# Altium PCB Kasli-DIOT.PCBDOC (part 2 of 23)
Units mm, origin at the board's own origin, x right, y up, seen from the top; angles counter-clockwise.
Board outline 222.9 x 100 mm, 10 copper layers (TopLayer, Layer 2, Layer 3, Layer 4, Layer 5, Layer 6, Layer 7, layer 8, Layer 9, BottomLayer), stack 1.564 mm thick; 977 components, 900 nets, 4676 pads, 2725 vias.
Unrouted connection lines stored in the file: 17.
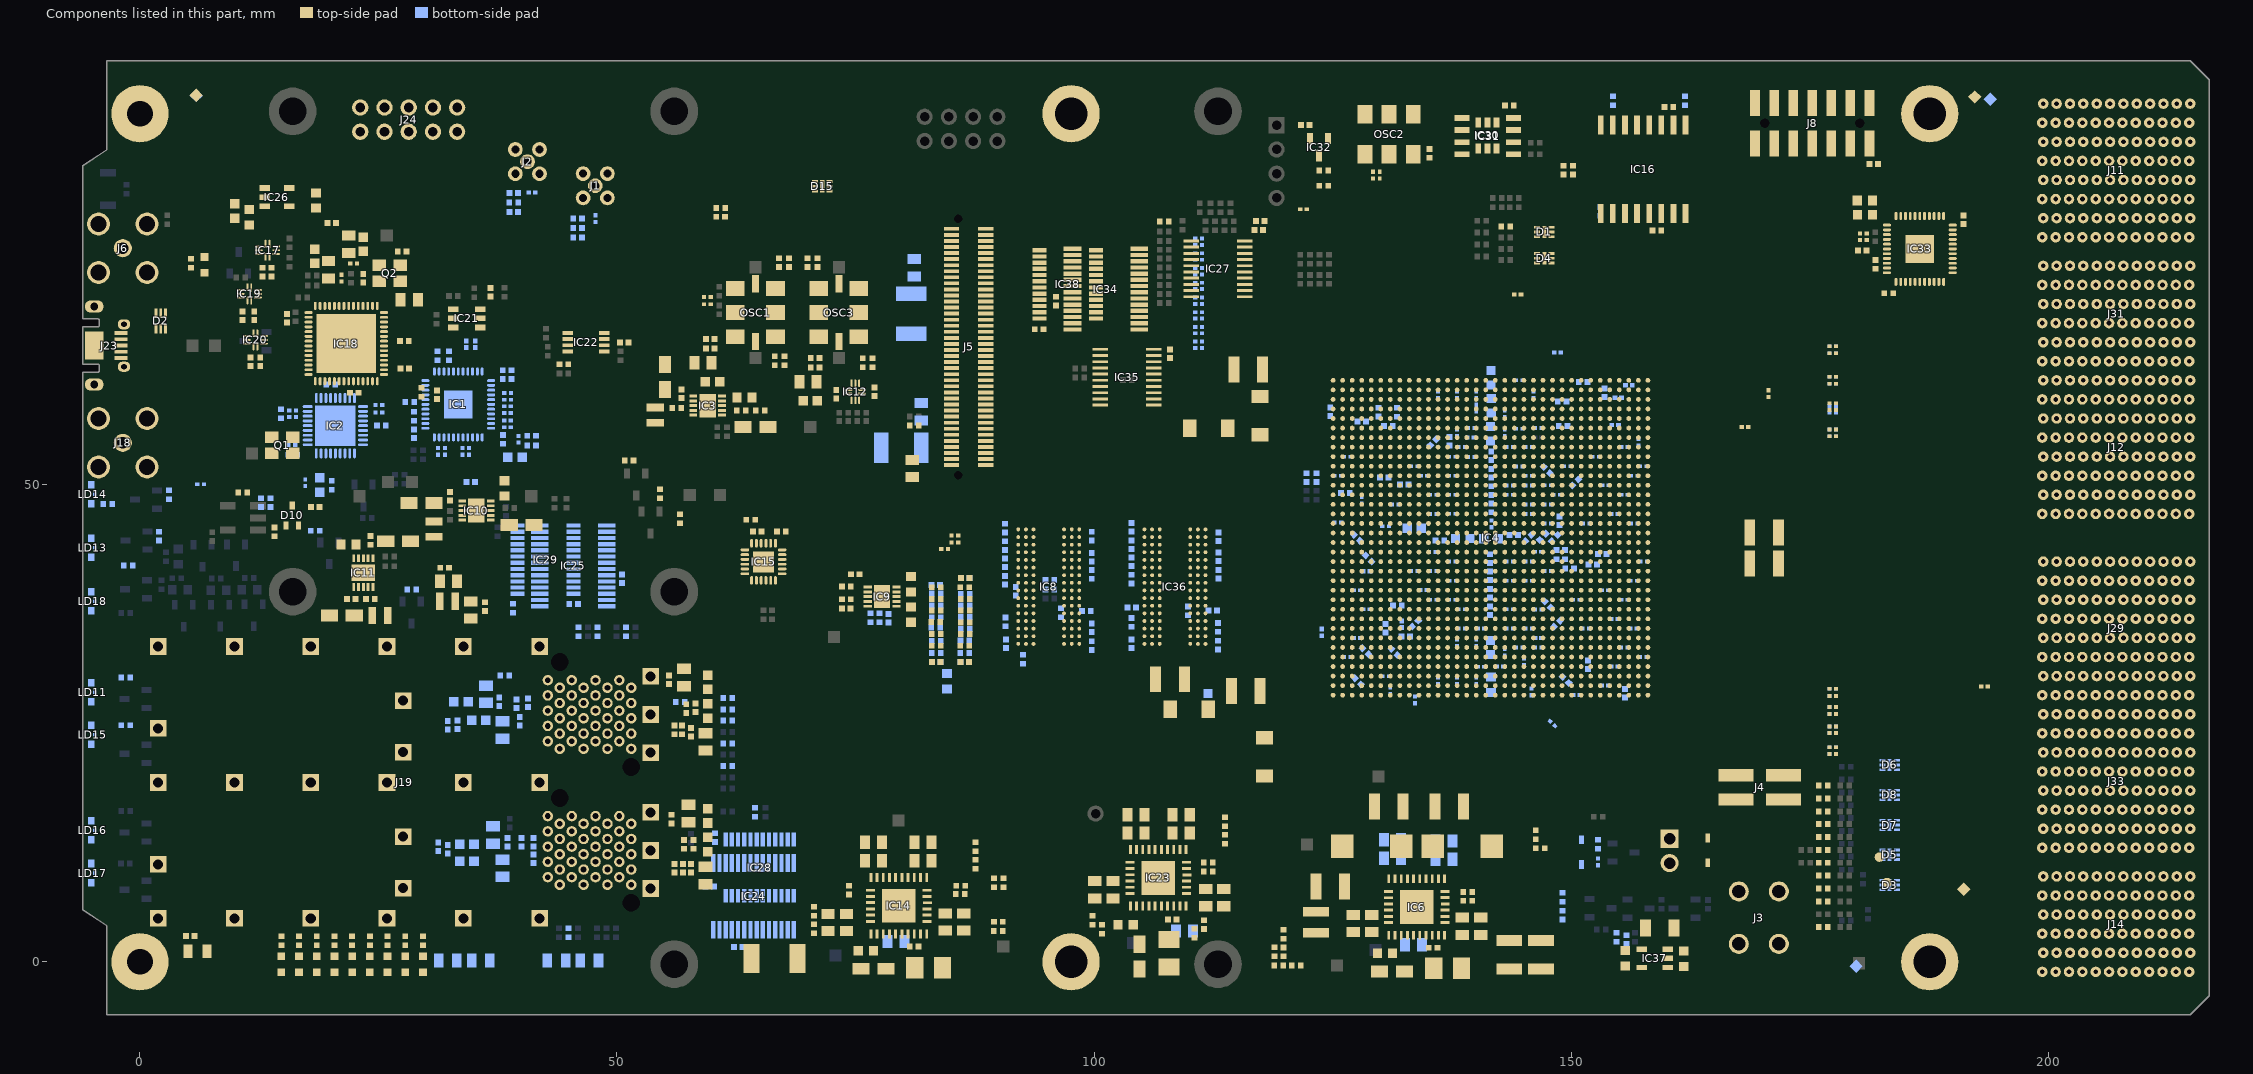
[diagram p10: the components of this part, seen from the top]

## Classes and differential pairs (continued)
differential pair SLOT7.LVDS_10: +SLOT7.LVDS_10_P -SLOT7.LVDS_10_N
differential pair SLOT7.LVDS_9: +SLOT7.LVDS_9_P -SLOT7.LVDS_9_N
differential pair SLOT7.LVDS_8: +SLOT7.LVDS_8_P -SLOT7.LVDS_8_N
differential pair SLOT7.LVDS_7: +SLOT7.LVDS_7_P -SLOT7.LVDS_7_N
differential pair SLOT7.LVDS_6: +SLOT7.LVDS_6_P -SLOT7.LVDS_6_N
differential pair SLOT7.LVDS_5: +SLOT7.LVDS_5_P -SLOT7.LVDS_5_N
differential pair SLOT7.LVDS_4: +SLOT7.LVDS_4_P -SLOT7.LVDS_4_N
differential pair SLOT7.LVDS_3: +SLOT7.LVDS_3_P -SLOT7.LVDS_3_N
differential pair SLOT7.LVDS_2: +SLOT7.LVDS_2_P -SLOT7.LVDS_2_N
differential pair SLOT7.LVDS_1: +SLOT7.LVDS_1_P -SLOT7.LVDS_1_N
differential pair SLOT7.LVDS_0: +SLOT7.LVDS_0_P -SLOT7.LVDS_0_N
differential pair SLOT6.LVDS_15: +SLOT6.LVDS_15_P -SLOT6.LVDS_15_N
differential pair SLOT6.LVDS_14: +SLOT6.LVDS_14_P -SLOT6.LVDS_14_N
differential pair SLOT6.LVDS_13: +SLOT6.LVDS_13_P -SLOT6.LVDS_13_N
differential pair SLOT6.LVDS_12: +SLOT6.LVDS_12_P -SLOT6.LVDS_12_N
differential pair SLOT6.LVDS_11: +SLOT6.LVDS_11_P -SLOT6.LVDS_11_N
differential pair SLOT6.LVDS_10: +SLOT6.LVDS_10_P -SLOT6.LVDS_10_N
differential pair SLOT6.LVDS_9: +SLOT6.LVDS_9_P -SLOT6.LVDS_9_N
differential pair SLOT6.LVDS_8: +SLOT6.LVDS_8_P -SLOT6.LVDS_8_N
differential pair SLOT6.LVDS_7: +SLOT6.LVDS_7_P -SLOT6.LVDS_7_N
differential pair SLOT6.LVDS_6: +SLOT6.LVDS_6_P -SLOT6.LVDS_6_N
differential pair SLOT6.LVDS_5: +SLOT6.LVDS_5_P -SLOT6.LVDS_5_N
differential pair SLOT6.LVDS_4: +SLOT6.LVDS_4_P -SLOT6.LVDS_4_N
differential pair SLOT6.LVDS_3: +SLOT6.LVDS_3_P -SLOT6.LVDS_3_N
differential pair SLOT6.LVDS_2: +SLOT6.LVDS_2_P -SLOT6.LVDS_2_N
differential pair SLOT6.LVDS_1: +SLOT6.LVDS_1_P -SLOT6.LVDS_1_N
differential pair SLOT6.LVDS_0: +SLOT6.LVDS_0_P -SLOT6.LVDS_0_N
differential pair SLOT5.LVDS_15: +SLOT5.LVDS_15_P -SLOT5.LVDS_15_N
differential pair SLOT5.LVDS_14: +SLOT5.LVDS_14_P -SLOT5.LVDS_14_N
differential pair SLOT5.LVDS_13: +SLOT5.LVDS_13_P -SLOT5.LVDS_13_N
differential pair SLOT5.LVDS_12: +SLOT5.LVDS_12_P -SLOT5.LVDS_12_N
differential pair SLOT5.LVDS_11: +SLOT5.LVDS_11_P -SLOT5.LVDS_11_N
differential pair SLOT5.LVDS_10: +SLOT5.LVDS_10_P -SLOT5.LVDS_10_N
differential pair SLOT5.LVDS_9: +SLOT5.LVDS_9_P -SLOT5.LVDS_9_N
differential pair SLOT5.LVDS_8: +SLOT5.LVDS_8_P -SLOT5.LVDS_8_N
differential pair SLOT5.LVDS_7: +SLOT5.LVDS_7_P -SLOT5.LVDS_7_N
differential pair SLOT5.LVDS_6: +SLOT5.LVDS_6_P -SLOT5.LVDS_6_N
differential pair SLOT5.LVDS_5: +SLOT5.LVDS_5_P -SLOT5.LVDS_5_N
differential pair SLOT5.LVDS_4: +SLOT5.LVDS_4_P -SLOT5.LVDS_4_N
differential pair SLOT5.LVDS_3: +SLOT5.LVDS_3_P -SLOT5.LVDS_3_N
differential pair SLOT5.LVDS_2: +SLOT5.LVDS_2_P -SLOT5.LVDS_2_N
differential pair SLOT5.LVDS_1: +SLOT5.LVDS_1_P -SLOT5.LVDS_1_N
differential pair SLOT5.LVDS_0: +SLOT5.LVDS_0_P -SLOT5.LVDS_0_N
differential pair SLOT4.LVDS_15: +SLOT4.LVDS_15_P -SLOT4.LVDS_15_N
differential pair SLOT4.LVDS_14: +SLOT4.LVDS_14_P -SLOT4.LVDS_14_N
differential pair SLOT4.LVDS_13: +SLOT4.LVDS_13_P -SLOT4.LVDS_13_N
differential pair SLOT4.LVDS_12: +SLOT4.LVDS_12_P -SLOT4.LVDS_12_N
differential pair SLOT4.LVDS_11: +SLOT4.LVDS_11_P -SLOT4.LVDS_11_N
differential pair SLOT4.LVDS_10: +SLOT4.LVDS_10_P -SLOT4.LVDS_10_N
differential pair SLOT4.LVDS_9: +SLOT4.LVDS_9_P -SLOT4.LVDS_9_N
differential pair SLOT4.LVDS_8: +SLOT4.LVDS_8_P -SLOT4.LVDS_8_N
differential pair SLOT4.LVDS_7: +SLOT4.LVDS_7_P -SLOT4.LVDS_7_N
differential pair SLOT4.LVDS_6: +SLOT4.LVDS_6_P -SLOT4.LVDS_6_N
differential pair SLOT4.LVDS_5: +SLOT4.LVDS_5_P -SLOT4.LVDS_5_N
differential pair SLOT4.LVDS_4: +SLOT4.LVDS_4_P -SLOT4.LVDS_4_N
differential pair SLOT4.LVDS_3: +SLOT4.LVDS_3_P -SLOT4.LVDS_3_N
differential pair SLOT4.LVDS_2: +SLOT4.LVDS_2_P -SLOT4.LVDS_2_N
differential pair SLOT4.LVDS_1: +SLOT4.LVDS_1_P -SLOT4.LVDS_1_N
differential pair SLOT4.LVDS_0: +SLOT4.LVDS_0_P -SLOT4.LVDS_0_N
differential pair SLOT3.LVDS_15: +SLOT3.LVDS_15_P -SLOT3.LVDS_15_N
differential pair SLOT3.LVDS_14: +SLOT3.LVDS_14_P -SLOT3.LVDS_14_N
differential pair SLOT3.LVDS_13: +SLOT3.LVDS_13_P -SLOT3.LVDS_13_N
differential pair SLOT3.LVDS_12: +SLOT3.LVDS_12_P -SLOT3.LVDS_12_N
differential pair SLOT3.LVDS_11: +SLOT3.LVDS_11_P -SLOT3.LVDS_11_N
differential pair SLOT3.LVDS_10: +SLOT3.LVDS_10_P -SLOT3.LVDS_10_N
differential pair SLOT3.LVDS_9: +SLOT3.LVDS_9_P -SLOT3.LVDS_9_N
differential pair SLOT3.LVDS_8: +SLOT3.LVDS_8_P -SLOT3.LVDS_8_N
differential pair SLOT3.LVDS_7: +SLOT3.LVDS_7_P -SLOT3.LVDS_7_N
differential pair SLOT3.LVDS_6: +SLOT3.LVDS_6_P -SLOT3.LVDS_6_N
differential pair SLOT3.LVDS_5: +SLOT3.LVDS_5_P -SLOT3.LVDS_5_N
differential pair SLOT3.LVDS_4: +SLOT3.LVDS_4_P -SLOT3.LVDS_4_N
differential pair SLOT3.LVDS_3: +SLOT3.LVDS_3_P -SLOT3.LVDS_3_N
differential pair SLOT3.LVDS_2: +SLOT3.LVDS_2_P -SLOT3.LVDS_2_N
differential pair SLOT3.LVDS_1: +SLOT3.LVDS_1_P -SLOT3.LVDS_1_N
differential pair SLOT3.LVDS_0: +SLOT3.LVDS_0_P -SLOT3.LVDS_0_N
differential pair SLOT2.LVDS_15: +SLOT2.LVDS_15_P -SLOT2.LVDS_15_N
differential pair SLOT2.LVDS_14: +SLOT2.LVDS_14_P -SLOT2.LVDS_14_N
differential pair SLOT2.LVDS_13: +SLOT2.LVDS_13_P -SLOT2.LVDS_13_N
differential pair SLOT2.LVDS_12: +SLOT2.LVDS_12_P -SLOT2.LVDS_12_N
differential pair SLOT2.LVDS_11: +SLOT2.LVDS_11_P -SLOT2.LVDS_11_N
differential pair SLOT2.LVDS_10: +SLOT2.LVDS_10_P -SLOT2.LVDS_10_N
differential pair SLOT2.LVDS_9: +SLOT2.LVDS_9_P -SLOT2.LVDS_9_N
differential pair SLOT2.LVDS_8: +SLOT2.LVDS_8_P -SLOT2.LVDS_8_N
differential pair SLOT2.LVDS_7: +SLOT2.LVDS_7_P -SLOT2.LVDS_7_N
differential pair SLOT2.LVDS_6: +SLOT2.LVDS_6_P -SLOT2.LVDS_6_N
differential pair SLOT2.LVDS_5: +SLOT2.LVDS_5_P -SLOT2.LVDS_5_N
differential pair SLOT2.LVDS_4: +SLOT2.LVDS_4_P -SLOT2.LVDS_4_N
differential pair SLOT2.LVDS_3: +SLOT2.LVDS_3_P -SLOT2.LVDS_3_N
differential pair SLOT2.LVDS_2: +SLOT2.LVDS_2_P -SLOT2.LVDS_2_N
differential pair SLOT2.LVDS_1: +SLOT2.LVDS_1_P -SLOT2.LVDS_1_N
differential pair SLOT2.LVDS_0: +SLOT2.LVDS_0_P -SLOT2.LVDS_0_N
differential pair SLOT1.LVDS_15: +SLOT1.LVDS_15_P -SLOT1.LVDS_15_N
differential pair SLOT1.LVDS_14: +SLOT1.LVDS_14_P -SLOT1.LVDS_14_N
differential pair SLOT1.LVDS_13: +SLOT1.LVDS_13_P -SLOT1.LVDS_13_N
differential pair SLOT1.LVDS_12: +SLOT1.LVDS_12_P -SLOT1.LVDS_12_N
differential pair SLOT1.LVDS_11: +SLOT1.LVDS_11_P -SLOT1.LVDS_11_N
differential pair SLOT1.LVDS_10: +SLOT1.LVDS_10_P -SLOT1.LVDS_10_N
differential pair SLOT1.LVDS_9: +SLOT1.LVDS_9_P -SLOT1.LVDS_9_N
differential pair SLOT1.LVDS_8: +SLOT1.LVDS_8_P -SLOT1.LVDS_8_N
differential pair SLOT1.LVDS_7: +SLOT1.LVDS_7_P -SLOT1.LVDS_7_N
differential pair SLOT1.LVDS_6: +SLOT1.LVDS_6_P -SLOT1.LVDS_6_N
differential pair SLOT1.LVDS_5: +SLOT1.LVDS_5_P -SLOT1.LVDS_5_N
differential pair SLOT1.LVDS_4: +SLOT1.LVDS_4_P -SLOT1.LVDS_4_N
differential pair SLOT1.LVDS_3: +SLOT1.LVDS_3_P -SLOT1.LVDS_3_N
differential pair SLOT1.LVDS_2: +SLOT1.LVDS_2_P -SLOT1.LVDS_2_N
differential pair SLOT1.LVDS_1: +SLOT1.LVDS_1_P -SLOT1.LVDS_1_N
differential pair SLOT1.LVDS_0: +SLOT1.LVDS_0_P -SLOT1.LVDS_0_N
differential pair MGT8_Tx: +MGT8_Tx_P -MGT8_Tx_N
differential pair MGT8_RxC: +MGT8_RxC_P -MGT8_RxC_N
differential pair MGT7_Tx: +MGT7_Tx_P -MGT7_Tx_N
differential pair MGT7_RxC: +MGT7_RxC_P -MGT7_RxC_N
differential pair MGT6_Tx: +MGT6_Tx_P -MGT6_Tx_N
differential pair MGT6_RxC: +MGT6_RxC_P -MGT6_RxC_N
differential pair MGT5_Tx: +MGT5_Tx_P -MGT5_Tx_N
differential pair MGT5_RxC: +MGT5_RxC_P -MGT5_RxC_N
differential pair MGT4_Tx: +MGT4_Tx_P -MGT4_Tx_N
differential pair MGT4_RxC: +MGT4_RxC_P -MGT4_RxC_N
differential pair MGT3_Tx: +MGT3_Tx_P -MGT3_Tx_N
differential pair MGT3_RxC: +MGT3_RxC_P -MGT3_RxC_N
differential pair MGT2_Tx: +MGT2_Tx_P -MGT2_Tx_N
differential pair MGT2_RxC: +MGT2_RxC_P -MGT2_RxC_N
differential pair MGT1_Tx: +MGT1_Tx_P -MGT1_Tx_N
differential pair MGT1_RxC: +MGT1_RxC_P -MGT1_RxC_N
differential pair DDR_DQS3: +DDR_DQS3_P -DDR_DQS3_N
differential pair DDR_DQS2: +DDR_DQS2_P -DDR_DQS2_N
differential pair DDR_DQS1: +DDR_DQS1_P -DDR_DQS1_N
differential pair DDR_DQS0: +DDR_DQS0_P -DDR_DQS0_N
differential pair DDR_CK: +DDR_CK_P -DDR_CK_N
differential pair 8_PE_CLK: +8_PE_CLK_P -8_PE_CLK_N
differential pair 7_PE_CLK: +7_PE_CLK_P -7_PE_CLK_N
differential pair 6_PE_CLK: +6_PE_CLK_P -6_PE_CLK_N
differential pair 5_PE_CLK: +5_PE_CLK_P -5_PE_CLK_N
differential pair 4_PE_CLK: +4_PE_CLK_P -4_PE_CLK_N
differential pair 3_PE_CLK: +3_PE_CLK_P -3_PE_CLK_N
differential pair 2_PE_CLK: +2_PE_CLK_P -2_PE_CLK_N
differential pair 1_PE_CLK: +1_PE_CLK_P -1_PE_CLK_N
differential pair Helper_DCXO: +Helper_DCXO_P -Helper_DCXO_N
differential pair CK_FPGAIO: +CK_FPGAIO_P -CK_FPGAIO_N
differential pair Main_DCXO: +Main_DCXO_P -Main_DCXO_N
differential pair Main_DCXO_C: +Main_DCXO_C_P -Main_DCXO_C_N
differential pair CK_GTP_125: +CK_GTP_125_P -CK_GTP_125_N
differential pair CKI_GTP: +CKI_GTP_P -CKI_GTP_N
differential pair CKI_FPGAIO: +CKI_FPGAIO_P -CKI_FPGAIO_N
differential pair CKIN0: +CKIN0_P -CKIN0_N
differential pair CLKREC: +CLKREC_P -CLKREC_N
differential pair USB_D_R: +USB_D_R_P -USB_D_R_N
differential pair CK_GTP: +CK_GTP_P -CK_GTP_N
differential pair CKOUT_D_1: +CKOUT_D_1_P -CKOUT_D_1_N
differential pair CKOUT_1: +CKOUT_1_P -CKOUT_1_N

## Components (designator, comment, footprint, x,y, rotation, side; value= is the part's Value field where it differs from the comment)
B28 "SMD Pad" C100 183.115,8.309 r90 top
B29 "SMD Pad" C100 182.321,10.975 r90 top
C1 "100nF" CAPC0603X33N#1 16.001,57.104 r0 bottom
C2 "100nF" CAPC0603X33N#1 16.001,57.791 r0 bottom
C3 "22uF" CAPC2012X135N 34.661,36.888 r90 top
C4 "100nF" CAPC0603X33N#1 33.798,53.5 r270 bottom
C5 "100nF" CAPC0603X33N#1 38.528,57.526 r0 bottom
C6 "100nF" CAPC0603X33N#1 34.498,53.5 r270 bottom
C7 "100nF" CAPC0603X33N#1 25.036,58.35 r0 bottom
C8 "100nF" CAPC0603X33N#1 31.232,53.5 r270 bottom
C9 "22uF" CAPMP3216X180N 55.011,61.3 r90 top
C10 "100nF" CAPC0603X33N#1 25.036,57.575 r0 bottom
C11 "100nF" CAPC0603X33N#1 31.957,53.5 r270 bottom
C12 "4.7uF" CAPC1005X55N 56.761,59.55 r270 top
C13 "22uF" CAPMP3216X180N 21.161,36.287 r180 top
C14 "100nF" CAPC0603X33N#1 38.528,58.232 r0 bottom
C15 "4.7uF" CAPC1005X55N 22.161,38.037 r0 top
C16 "22uF" CAPC1709X100N 63.361,59.15 r180 top
C17 "22uF" CAPC1709X100N 21.856,43.74 r0 top
C18 "22uF" CAPC2012X135N 32.342,39.89 r180 top
C19 "22uF" CAPMP3216X180N 64.511,56.05 r0 top
C20 "100nF" CAPC0603X33N#1 47.736,77.9 r90 bottom
C21 "100nF" CAPC0603X33N#1 41.086,80.65 r180 bottom
C22 "22uF" CAPC2012X135N 79.248,2.128 r0 bottom
C23 "1nF" CAPC1005X55N 16.011,53.15 r0 bottom
C24 "1uF" CAPC1005X55N 25.309,56.199 r180 bottom
C25 "100nF" CAPC0603X33N#1 15.911,54.167 r0 bottom
C26 "100nF" CAPC0603X33N#1 17.331,50.217 r90 bottom
C27 "22uF" CAPC2012X135N 133.504,1.775 r0 bottom
C28 "100nF" CAPC1005X55N 76.986,59.75 r270 top
C29 "100nF" CAPC1005X55N 72.986,59.5 r90 top
C30 "33uF" CAPMP3528X210N 137.061,-0.676 r0 top
C31 "4.7uF" CAPC1005X55N 124.761,57.65 r270 bottom
C32 "10uF" CAPMP3216X180N 131.236,-1 r180 top
C33 "4.7uF" CAPC1005X55N 155.661,28.15 r270 bottom
C34 "4.7uF" CAPC1005X55N 151.761,31.15 r90 bottom
C35 "4.7uF" CAPC1005X55N 130.423,50.775 r180 bottom
C36 "100nF" CAPC1005X55N 135.536,1.475 r180 top
C37 "4.7uF" CAPC1005X55N 128.061,56.65 r180 bottom
C38 "100nF" CAPC1005X55N 31.92,41.31 r180 top
C39 "4.7uF" CAPC1005X55N 130.861,56.15 r0 bottom
C40 "22uF" CAPC2012X135N 109.49,3.225 r180 bottom
C41 "100nF" CAPC0603X33N#1 110.97,65.879 r0 bottom
C42 "22uF" CAPC2012X135N 131.287,12.797 r0 bottom
C43 "10nF" CAPC1005X55N 45.861,75.924 r0 bottom
C44 "10nF" CAPC1005X55N 45.861,77.925 r0 bottom
C45 "22uF" CAPMP3216X180N 27.065,44.086 r0 top
C46 "10nF" CAPC1005X55N 39.186,78.574 r0 bottom
C47 "10nF" CAPC1005X55N 39.186,80.575 r0 bottom
C48 "22uF" CAPC2012X135N 136.689,12.662 r180 bottom
C49 "100nF" CAPC1005X55N 31.142,59.44 r270 top
C50 "22uF" CAPC1608X90N 111.936,27.375 r270 bottom
C51 "100nF" CAPC0603X33N#1 141.657,45.905 r90 bottom
C52 "100nF" CAPC1005X55N 181.744,83.631 r180 top
C53 "100nF" CAPC1005X55N 60.856,78.095 r180 top
C54 "100nF" CAPC0603X33N#1 110.97,68.967 r180 bottom
C55 "470nF" CAPC0603X33N#1 135.561,48.95 r0 bottom
C56 "100uF" CAPC3225X270N 143.535,0.74 r90 top
C57 "4.7uF" CAPC1005X55N 132.503,50.052 r0 bottom
C58 "4.7uF" CAPC1005X55N 149.161,56.15 r0 bottom
C59 "4.7uF" CAPC1005X55N 152.261,41.625 r180 bottom
C60 "470nF" CAPC0603X33N#1 154.561,30.95 r0 bottom
C61 "470nF" CAPC0603X33N#1 157.561,31.95 r0 bottom
C62 "470nF" CAPC0603X33N#1 130.561,45.65 r0 bottom
C63 "100nF" CAPC0603X33N#1 177.436,22.5 r0 top
C64 "470nF" CAPC0603X33N#1 152.611,52.95 r180 bottom
C65 "100uF" CAPC3225X270N 170.236,41.765 r180 top
C66 "4.7uF" CAPC1005X55N 148.531,35.435 r45 bottom
C67 "4.7uF" CAPC1005X55N 150.461,50.25 r225 bottom
C68 "470nF" CAPC0603X33N#1 131.561,47.95 r180 bottom
C69 "470nF" CAPC0603X33N#1 154.561,46.95 r180 bottom
C70 "100nF" CAPC0603X33N#1 177.436,21.775 r0 top
C71 "100nF" CAPC0603X33N#1 177.436,24.675 r0 top
C72 "100nF" CAPC0603X33N#1 177.436,23.975 r0 top
C73 "100nF" CAPC0603X33N#1 177.436,26.7 r0 top
C74 "100nF" CAPC0603X33N#1 177.436,28.625 r0 top
C75 "470nF" CAPC0603X33N#1 157.561,51.95 r0 bottom
C76 "470nF" CAPC0603X33N#1 150.561,37.95 r180 bottom
C77 "100nF" CAPC0603X33N#1 110.97,66.551 r0 bottom
C78 "4.7uF" CAPC1005X55N 153.261,42.75 r0 bottom
C79 "4.7uF" CAPC1005X55N 129.836,57.625 r90 bottom
C80 "470nF" CAPC0603X33N#1 128.061,48.4 r270 bottom
C81 "470nF" CAPC0603X33N#1 157.061,54.45 r90 bottom
C82 "470nF" CAPC0603X33N#1 126.561,52.95 r180 bottom
C83 "470nF" CAPC0603X33N#1 153.561,38.95 r180 bottom
C84 "100uF" CAPC3225X270N 170.236,44.99 r180 top
C85 "4.7uF" CAPC1005X55N 149.061,58.75 r0 bottom
C86 "4.7uF" CAPC1005X55N 133.661,35.45 r45 bottom
C87 "470nF" CAPC0603X33N#1 155.611,48.95 r0 bottom
C88 "470nF" CAPC0603X33N#1 156.611,45.95 r0 bottom
C89 "470nF" CAPC0603X33N#1 153.611,49.95 r180 bottom
C90 "470nF" CAPC0603X33N#1 155.611,53.95 r180 bottom
C91 "330uF" CAPMP7343X190N 129.111,12.125 r180 top
C92 "4.7uF" CAPC1005X55N 127.561,44.45 r315 bottom
C93 "4.7uF" CAPC1005X55N 135.561,54.45 r225 bottom
C94 "4.7uF" CAPC1005X55N 149.436,29.55 r315 bottom
C95 "470nF" CAPC0603X33N#1 137.561,48.95 r0 bottom
C96 "4.7uF" CAPC1005X55N 127.661,29.4 r135 bottom
C97 "470nF" CAPC0603X33N#1 145.061,31.45 r270 bottom
C98 "470nF" CAPC0603X33N#1 135.561,37.95 r0 bottom
C99 "470nF" CAPC0603X33N#1 145.586,47.95 r180 bottom
C100 "100nF" CAPC0603X33N#1 110.97,69.639 r180 bottom
C101 "22uF" CAPC1709X100N 141.613,29.05 r90 bottom
C102 "470nF" CAPC0603X33N#1 138.561,36.95 r0 bottom
C103 "470nF" CAPC0603X33N#1 137.561,50.95 r0 bottom
C104 "470nF" CAPC0603X33N#1 137.561,46.975 r0 bottom
C105 "470nF" CAPC0603X33N#1 143.561,41.95 r180 bottom
C106 "470nF" CAPC0603X33N#1 143.561,36.95 r180 bottom
C107 "470nF" CAPC0603X33N#1 143.561,39.95 r180 bottom
C108 "470nF" CAPC0603X33N#1 143.561,48.95 r180 bottom
C109 "4.7uF" CAPC1005X55N 131.486,32.475 r315 bottom
C110 "4.7uF" CAPC1005X55N 141.511,38.625 r90 bottom
C111 "4.7uF" CAPC1005X55N 141.511,36.8 r90 bottom
C112 "100nF" CAPC0603X33N#1 140.561,30.925 r180 bottom
C113 "100nF" CAPC0603X33N#1 146.561,32.95 r0 bottom
C114 "100nF" CAPC0603X33N#1 138.061,29.45 r90 bottom
C115 "100nF" CAPC0603X33N#1 140.061,29.45 r270 bottom
C116 "100nF" CAPC0603X33N#1 136.061,29.45 r90 bottom
C117 "470nF" CAPC0603X33N#1 135.561,46.95 r0 bottom
C118 "470nF" CAPC0603X33N#1 135.461,42.95 r0 bottom
C119 "470nF" CAPC0603X33N#1 135.561,40.95 r0 bottom
C120 "100nF" CAPC0603X33N#1 145.561,46.925 r180 bottom
C121 "470nF" CAPC0603X33N#1 145.561,39.95 r180 bottom
C122 "100nF" CAPC0603X33N#1 145.561,41.95 r180 bottom
C123 "4.7uF" CAPC1005X55N 147.561,37.45 r135 bottom
C124 "4.7uF" CAPC1005X55N 147.461,51.55 r135 bottom
C125 "470nF" CAPC0603X33N#1 134.586,50.95 r0 bottom
C126 "470nF" CAPC0603X33N#1 156.573,39.95 r180 bottom
C127 "470nF" CAPC0603X33N#1 151.611,45.95 r180 bottom
C128 "470nF" CAPC0603X33N#1 155.611,37.95 r0 bottom
C129 "100uF" CAPC3225X270N 116.161,62.075 r0 top
C130 "22uF" CAPC2012X135N 131.287,10.872 r0 bottom
C131 "22uF" CAPC2012X135N 136.689,10.737 r180 bottom
C132 "22uF" CAPC2012X135N 138.586,3.723 r270 top
C133 "22uF" CAPC2012X135N 140.536,3.723 r270 top
C134 "4.7uF" CAPC1005X55N 141.511,40.45 r90 bottom
C135 "4.7uF" CAPC1005X55N 141.636,49.4 r270 bottom
C136 "470nF" CAPC0603X33N#1 157.611,41.95 r0 bottom
C137 "22uF" CAPC2012X135N 127.161,4 r270 top
C138 "470nF" CAPC0603X33N#1 133.561,51.95 r180 bottom
C139 "470nF" CAPC0603X33N#1 156.546,34.95 r0 bottom
C140 "470nF" CAPC0603X33N#1 151.549,34.95 r180 bottom
C141 "100nF" CAPC0603X33N#1 110.97,64.336 r0 bottom
C142 "100nF" CAPC0603X33N#1 177.436,55.083 r0 top
C143 "4.7uF" CAPC1005X55N 143.986,44.75 r180 bottom
C144 "22uF" CAPC2012X135N 129.111,4 r270 top
C145 "4.7uF" CAPC1005X55N 145.536,44.425 r45 bottom
C146 "470nF" CAPC0603X33N#1 155.561,32.95 r180 bottom
C147 "470nF" CAPC0603X33N#1 153.561,28.95 r180 bottom
C148 "470nF" CAPC0603X33N#1 148.511,48.95 r0 bottom
C149 "470nF" CAPC0603X33N#1 156.611,50.95 r180 bottom
C150 "100uF" CAPC3225X270N 107.961,29.625 r0 top
C151 "4.7uF" CAPC1005X55N 148.286,44.425 r45 bottom
C152 "4.7uF" CAPC1005X55N 147.036,44.55 r45 bottom
C153 "470nF" CAPC0603X33N#1 133.561,40.95 r180 bottom
C154 "470nF" CAPC0603X33N#1 128.561,36.95 r180 bottom
C155 "470nF" CAPC0603X33N#1 127.561,33.95 r0 bottom
C156 "470nF" CAPC0603X33N#1 127.561,38.95 r180 bottom
C157 "100nF" CAPC0603X33N#1 110.97,70.511 r180 bottom
C158 "4.7uF" CAPC1005X55N 148.936,42.2 r180 bottom
C159 "100nF" CAPC0603X33N#1 152.836,10.475 r270 bottom
C160 "100nF" CAPC1005X55N 58.011,12.3 r90 top
C161 "100nF" CAPC1005X55N 160.267,89.586 r0 top
C162 "100nF" CAPC1005X55N 74.986,40.625 r0 top
C163 "100nF" CAPC1005X55N 128.786,42.275 r315 bottom
C164 "10nF" CAPC1005X55N 90.686,40 r270 bottom
C165 "10nF" CAPC1005X55N 112.461,36.825 r180 bottom
C166 "10nF" CAPC1005X55N 103.915,40.125 r270 bottom
C167 "10nF" CAPC1005X55N 132.672,34.109 r180 bottom
C168 "100nF" CAPC1005X55N 128.461,32.55 r135 bottom
C169 "100nF" CAPC1005X55N 99.211,36.775 r180 bottom
C170 "4.7uF" CAPC1005X55N 113.036,44.55 r270 bottom
C171 "470nF" CAPC1005X55N 99.761,44.625 r270 bottom
C172 "1uF" CAPC1005X55N 74.03,37.025 r0 top
C173 "22uF" CAPC1709X100N 84.58,29.4 r90 bottom
C174 "22uF" CAPC1709X100N 80.797,39.571 r270 top
C175 "10nF" CAPC1005X55N 78.48,36.025 r90 bottom
C176 "22uF" CAPC1709X100N 80.797,36.392 r90 top
C177 "100nF" CAPC1005X55N 74.055,39.325 r0 top
C178 "1uF" CAPC1005X55N 32.261,24.8 r90 bottom
C179 "10uF" CAPC2012X95N 36.261,28.05 r270 bottom
C180 "1uF" CAPC1005X55N 37.661,27.25 r270 bottom
C181 "100nF" CAPC1005X55N 40.686,27.15 r270 bottom
C182 "100nF" CAPC1005X55N 39.461,27.05 r270 bottom
C183 "100nF" CAPC1005X55N 39.811,25.2 r90 bottom
C184 "10uF" CAPC2012X95N 38.011,24.3 r90 bottom
C185 "100nF" CAPC1005X55N 33.286,24.85 r90 bottom
C186 "100nF" CAPC1005X55N 107.962,63.753 r90 top
C187 "1uF" CAPC1608X87N 130.501,0.89 r0 top
C188 "100nF" CAPC0603X33N#1 59.464,69.679 r180 top
C189 "100nF" CAPC0603X33N#1 59.464,68.929 r180 top
C190 "1uF" CAPC1005X55N 38.036,54.75 r90 bottom
C191 "100nF" CAPC1005X55N 28.736,55.35 r90 bottom
C192 "100nF" CAPC1005X55N 94.242,66.302 r0 top
C193 "100nF" CAPC1005X55N 117.277,76.689 r180 top
C194 "22uF" CAPC2012X135N 76.886,10.6 r0 top
C195 "22uF" CAPC2012X135N 82.086,12.525 r180 top
C196 "100nF" CAPC1005X55N 122.151,87.712 r0 top
C197 "100nF" CAPC1005X55N 62.702,1.569 r0 bottom
C198 "100nF" CAPC1005X55N 64.689,45.092 r0 top
C199 "100nF" CAPC1005X55N 36.161,37.238 r90 top
C200 "100nF" CAPC0603X33N#1 148.061,24.975 r315 bottom
C201 "100nF" CAPC0603X33N#1 148.586,63.875 r0 bottom
C202 "10uF" CAPC1608X87N 11.461,78.05 r90 top
C203 "100nF" CAPC0603X33N#2 144.411,69.948 r180 top
C204 "100nF" CAPC1005X55N 159.011,76.675 r0 top
C205 "22uF" CAPC1709X100N 18.436,79.8 r270 top
C206 "4.7uF" CAPC2012X135N 28.23,69.38 r180 top
C207 "22pF" CAPC1005X55N 27.468,74.46 r180 top
C208 "22pF" CAPC1005X55N 23.404,71.666 r270 top
C209 "4.7uF" CAPC2012X135N 21.88,75.222 r270 top
C210 "100nF" CAPC0603X33N#1 22.388,73.19 r0 top
C211 "4.7uF" CAPC2012X135N 19.761,72.55 r270 top
C212 "100nF" CAPC0603X33N#1 21.118,71.666 r270 top
C213 "100nF" CAPC1005X55N 20.086,77.45 r180 top
C214 "100nF" CAPC1005X55N 12.609,62.903 r90 top
C215 "100nF" CAPC1005X55N 11.974,67.729 r90 top
C216 "100nF" CAPC1005X55N 36.74,70.2 r270 top
C217 "100nF" CAPC1005X55N 12.863,72.301 r90 top
C218 "100nF" CAPC1005X55N 11.593,62.903 r90 top
C219 "100nF" CAPC1005X55N 10.736,67.725 r90 top
C220 "100nF" CAPC1005X55N 44.443,62.633 r0 top
C221 "100nF" CAPC1005X55N 50.761,64.925 r180 top
C222 "100nF" CAPC1005X55N 27.722,65.062 r180 top
C223 "100nF" CAPC1005X55N 15.403,67.475 r270 top
C224 "100nF" CAPC1005X55N 27.736,62.175 r180 top
C225 "22uF" CAPMP3216X180N 29.502,48.08 r180 top
C226 "1nF" CAPC1005X55N 59.761,65.3 r0 top
C227 "100nF" CAPC1005X55N 50.52,40.15 r90 bottom
C228 "100nF" CAPC0603X33N#1 6.35,50.05 r0 bottom
C229 "100nF" CAPC0603X33N#1 177.436,57.84 r0 top
C230 "100nF" CAPC0603X33N#1 177.436,25.975 r0 top
C231 "100nF" CAPC0603X33N#1 177.436,27.875 r0 top
C232 "100nF" CAPC0603X33N#1 177.436,55.8 r0 top
C233 "100nF" CAPC0603X33N#1 177.436,58.55 r0 top
C234 "100nF" CAPC1005X55N 38.961,61.562 r270 bottom
C235 "47uF" CAPC3225X270N 124.767,7.893 r180 top
C236 "100nF" CAPC0603X33N#1 129.251,82.45 r270 top
C237 "100nF" CAPC0603X33N#1 129.959,82.45 r270 top
C238 "10nF" CAPC1005X55N 135.166,84.733 r270 top
C239 "100nF" CAPC1005X55N 41.046,55.142 r180 bottom
C240 "4.7uF" CAPC1005X55N 149.847,41.221 r180 bottom
C241 "100nF" CAPC1005X55N 41.046,54.142 r180 bottom
C242 "470nF" CAPC0603X33N#1 39.686,54.775 r90 bottom
C243 "22pF" CAPC1005X55N 38.021,61.562 r270 bottom
C244 "1uF" CAPC1005X55N 57.011,12.3 r90 top
C245 "100nF" CAPC0603X33N#1 121.961,78.875 r180 top
C246 "100nF" CAPC0603X33N#2 35.136,64.732 r270 bottom
C247 "100nF" CAPC0603X33N#2 34.214,64.732 r270 bottom
C258 "100nF" CAPC0603X33N#1 177.436,26.7 r180 bottom
C259 "1uF" CAPC1005X55N 57.261,26.55 r90 top
C260 "10uF" CAPC2012X95N 59.261,23.05 r90 top
C261 "1uF" CAPC1005X55N 57.761,24.05 r90 top
C262 "100nF" CAPC1005X55N 56.011,24.3 r90 top
C263 "100nF" CAPC1005X55N 56.811,24.3 r90 top
C264 "10uF" CAPC2012X95N 57.011,29.8 r270 top
C265 "100nF" CAPC1005X55N 55.461,29.55 r270 top
C266 "100nF" CAPC1005X55N 32.261,11.8 r270 bottom
C267 "1uF" CAPC1005X55N 31.261,12.05 r270 bottom
C268 "10uF" CAPC2012X95N 37.011,13.3 r270 bottom
C269 "1uF" CAPC1005X55N 38.511,12.55 r270 bottom
C270 "100nF" CAPC1005X55N 40.011,12.55 r270 bottom
C271 "100nF" CAPC1005X55N 41.261,12.55 r270 bottom
C272 "10uF" CAPC2012X95N 38.011,9.8 r90 bottom
C273 "100nF" CAPC1005X55N 41.261,10.8 r90 bottom
C274 "10uF" CAPC2012X95N 59.261,9.05 r90 top
C275 "1uF" CAPC1005X55N 57.761,9.8 r90 top
C276 "100nF" CAPC1005X55N 58.235,26.643 r90 top
C277 "100nF" CAPC1005X55N 56.011,9.8 r90 top
C278 "4.7uF" CAPC1005X55N 32.511,48.8 r270 top
C279 "22uF" CAPC1709X100N 38.211,49.625 r270 top
C280 "10uF" CAPC2012X95N 57.511,15.55 r270 top
C281 "100nF" CAPC1005X55N 56.906,9.807 r90 top
C286 "22uF" CAPMP3216X180N 40.011,45.8 r0 top
C287 "1nF" CAPC1005X55N 59.761,64.3 r0 top
C288 "4.7uF" CAPC2012X135N 59.011,62.8 r0 top
C289 "4.7uF" CAPC2012X135N 70.011,60.8 r0 top
C290 "1nF" CAPC1005X55N 70.761,62.3 r0 top
C291 "1nF" CAPC1005X55N 70.761,63.3 r0 top
C292 "4.7uF" CAPC1005X55N 117.425,77.638 r180 top
C293 "100nF" CAPC1005X55N 13.786,72.301 r90 top
C295 "100nF" CAPC0603X33N#1 193.336,28.85 r0 top
C296 "100nF" CAPC1005X55N 18.361,47.684 r180 top
C297 "100nF" CAPC0603X33N#1 168.236,56.05 r180 top
C298 "100nF" CAPC1005X55N 34.661,50.3 r180 bottom
C299 "22uF" CAPC2012X135N 76.886,12.525 r0 top
C300 "100nF" CAPC0603X33N#1 170.703,59.552 r270 top
C301 "22uF" CAPC2012X135N 82.086,10.6 r180 top
C302 "22uF" CAPC2012X135N 101.986,7.55 r270 top
C303 "22uF" CAPC2012X135N 104.411,13.5 r0 top
C304 "22uF" CAPC2012X135N 104.411,15.425 r0 top
C305 "100nF" CAPC1005X55N 45.448,37.517 r0 bottom
C306 "100nF" CAPC1005X55N 59.736,7.875 r0 bottom
C307 "100nF" CAPC1005X55N 143.547,89.774 r0 top
C308 "470nF" CAPC0603X33N#1 154.561,35.937 r180 bottom
C309 "470nF" CAPC0603X33N#1 125.561,46.05 r180 bottom
C310 "470nF" CAPC0603X33N#1 125.536,50.95 r0 bottom
C311 "470nF" CAPC0603X33N#1 149.611,51.95 r180 bottom
C312 "100uF" CAPC3225X270N 115.911,28.4 r0 top
C313 "4.7uF" CAPC1005X55N 148.936,43.175 r180 bottom
C314 "4.7uF" CAPC1005X55N 148.786,46.225 r90 bottom
C315 "470nF" CAPC0603X33N#1 131.061,28.4 r270 bottom
C316 "470nF" CAPC0603X33N#1 130.561,29.925 r180 bottom
C317 "470nF" CAPC0603X33N#1 133.661,27.45 r90 bottom
C318 "470nF" CAPC0603X33N#1 126.561,31.95 r180 bottom
C319 "22uF" CAPC1608X90N 141.636,58.275 r270 bottom
C320 "22uF" CAPC1608X90N 141.563,32.95 r90 bottom
C321 "22uF" CAPC1608X90N 141.611,61.225 r270 bottom
C322 "470nF" CAPC0603X33N#1 140.063,33.45 r270 bottom
C323 "100nF" CAPC0603X33N#1 144.561,32.95 r180 bottom
C324 "100nF" CAPC0603X33N#1 143.061,32.45 r270 bottom
C325 "100nF" CAPC0603X33N#1 145.561,34.95 r180 bottom
C326 "100nF" CAPC0603X33N#1 143.561,34.95 r180 bottom
C327 "100nF" CAPC0603X33N#1 140.561,34.95 r0 bottom
C328 "22nF" CAPC0603X33N#1 145.861,28.3 r90 bottom
C329 "22nF" CAPC0603X33N#1 142.561,30.95 r0 bottom
C330 "22nF" CAPC0603X33N#1 138.561,34.95 r0 bottom
C331 "22nF" CAPC0603X33N#1 138.061,33.45 r270 bottom
C332 "22uF" CAPC1608X90N 141.561,55.35 r90 bottom
C333 "470nF" CAPC0603X33N#1 138.061,59.45 r90 bottom
C334 "100nF" CAPC0603X33N#1 136.061,59.45 r270 bottom
C335 "100nF" CAPC0603X33N#1 143.061,57.45 r90 bottom
C336 "100nF" CAPC0603X33N#1 140.061,59.45 r90 bottom
C337 "100nF" CAPC0603X33N#1 140.061,58.05 r90 bottom
C338 "100nF" CAPC0603X33N#1 146.561,55.95 r180 bottom
C339 "22uF" CAPC1608X90N 138.661,44.35 r180 bottom
C340 "470nF" CAPC0603X33N#1 138.561,53.95 r180 bottom
C341 "100nF" CAPC0603X33N#1 143.561,53.95 r0 bottom
C342 "100nF" CAPC0603X33N#1 145.561,53.95 r180 bottom
C343 "100nF" CAPC0603X33N#1 144.558,55.881 r0 bottom
C344 "100nF" CAPC0603X33N#1 138.061,55.45 r90 bottom
C345 "100nF" CAPC0603X33N#1 139.461,54.95 r0 bottom
C346 "330uF" CAPMP7343X190N 138.586,12.125 r0 top
C347 "22nF" CAPC0603X33N#1 146.061,59.45 r90 bottom
C348 "22nF" CAPC0603X33N#1 144.561,60.95 r180 bottom
C349 "22nF" CAPC0603X33N#1 143.061,55.45 r90 bottom
C350 "22nF" CAPC0603X33N#1 139.561,55.95 r180 bottom
C351 "100uF" CAPC3225X270N 146.86,0.74 r90 top
C352 "4.7uF" CAPC1005X55N 141.511,42.275 r90 bottom
C353 "470nF" CAPC0603X33N#1 145.57,49.937 r180 bottom
C354 "100nF" CAPC0603X33N#1 145.586,50.95 r180 bottom
C355 "4.7uF" CAPC1005X55N 141.636,51.2 r270 bottom
C356 "4.7uF" CAPC1005X55N 141.636,47.575 r270 bottom
C357 "4.7uF" CAPC1005X55N 136.261,44.15 r0 bottom
C358 "4.7uF" CAPC1005X55N 137.261,54.575 r270 bottom
C359 "100uF" CAPC3225X270N 137.232,16.269 r180 top
C360 "100uF" CAPC3225X270N 130.911,16.275 r0 top
C361 "4.7uF" CAPC1005X55N 141.636,53.05 r270 bottom
C362 "33uF" CAPMP3528X210N 82.661,-0.6 r0 top
C363 "33uF" CAPMP3528X210N 107.859,0.901 r270 top
C364 "10uF" CAPMP3216X180N 76.886,-0.725 r180 top
C365 "10uF" CAPMP3216X180N 104.786,0.533 r270 top
C366 "100nF" CAPC1005X55N 81.136,1.625 r180 top
C367 "100nF" CAPC1005X55N 108.191,4.449 r180 top
C368 "470nF" CAPC0603X33N#1 147.561,40.95 r0 bottom
C369 "470nF" CAPC0603X33N#1 146.536,42.975 r0 bottom
C370 "470nF" CAPC0603X33N#1 147.561,45.95 r180 bottom
C371 "470nF" CAPC0603X33N#1 147.561,47.95 r180 bottom
C372 "470nF" CAPC0603X33N#1 147.561,49.95 r180 bottom
C373 "470nF" CAPC0603X33N#1 137.561,52.938 r0 bottom
C374 "470nF" CAPC0603X33N#1 139.561,52.925 r0 bottom
C375 "470nF" CAPC0603X33N#1 144.561,51.925 r180 bottom
C376 "470nF" CAPC0603X33N#1 143.561,49.925 r180 bottom
C377 "470nF" CAPC0603X33N#1 137.561,41.975 r0 bottom
C378 "470nF" CAPC0603X33N#1 137.586,39.95 r0 bottom
C379 "470nF" CAPC0603X33N#1 137.561,37.95 r0 bottom
C380 "470nF" CAPC0603X33N#1 146.561,36.925 r180 bottom
C381 "22uF" CAPC2012X135N 100.061,7.55 r270 top
C382 "1uF" CAPC1608X87N 76.086,1.15 r0 top
C383 "22uF" CAPC2012X135N 84.411,4.175 r270 top
C384 "22uF" CAPC2012X135N 86.336,4.175 r270 top
C385 "22uF" CAPC2012X135N 109.136,13.5 r180 top
C386 "22uF" CAPC2012X135N 109.136,15.425 r180 top
C387 "22uF" CAPC2012X135N 111.711,6.725 r270 top
C388 "22uF" CAPC2012X135N 113.611,6.725 r270 top
C389 "22uF" CAPC2012X135N 74.063,4.135 r270 top
C390 "22uF" CAPC2012X135N 72.113,4.135 r270 top
C391 "1uF" CAPC1608X87N 103.311,3.9 r0 top
C392 "100nF" CAPC0603X33N#1 110.97,65.007 r0 bottom
C393 "100nF" CAPC0603X33N#1 110.97,71.183 r180 bottom
C394 "100nF" CAPC0603X33N#1 85.411,43.953 r180 top
C395 "100nF" CAPC0603X33N#1 85.411,44.671 r180 top
C396 "27pF" CAPC1005X55N 5.275,2.69 r0 top
C397 "100nF" CAPC1005X55N 155.821,2.338 r270 bottom
C398 "10uF" CAPC3216X180N 159.3,3.531 r180 top
C399 "100nF" CAPC0603X33N#1 180.636,76.35 r0 top
C400 "100nF" CAPC0603X33N#1 180.636,75.65 r0 top
C401 "100nF" CAPC0603X33N#1 38.528,56.032 r0 bottom
C402 "100nF" CAPC0603X33N#1 38.528,56.732 r0 bottom
C403 "100nF" CAPC0603X33N#1 110.97,73.599 r0 bottom
C404 "100nF" CAPC1005X55N 180.536,74.575 r0 top
C405 "100nF" CAPC0603X33N#1 110.97,72.055 r180 bottom
C406 "1uF" CAPC1608X87N 180.811,78.3 r0 top
C407 "100nF" CAPC1005X55N 191.161,77.8 r270 top
C408 "100nF" CAPC1005X55N 181.936,73.1 r90 top
C409 "100nF" CAPC1005X55N 22.461,59.65 r180 top
C410 "100nF" CAPC0603X33N#1 177.436,24.675 r180 bottom
C411 "100nF" CAPC0603X33N#1 177.436,23.975 r180 bottom
C412 "100nF" CAPC1005X55N 55.716,14.965 r270 top
C413 "100nF" CAPC0603X33N#1 110.97,74.271 r0 bottom
C414 "100nF" CAPC0603X33N#1 110.97,72.727 r180 bottom
C415 "100nF" CAPC0603X33N#1 110.97,67.423 r0 bottom
C416 "100nF" CAPC0603X33N#1 110.97,75.143 r180 bottom
C417 "100nF" CAPC0603X33N#1 110.97,68.095 r0 bottom
C418 "100nF" CAPC0603X33N#1 110.97,75.815 r180 bottom
C419 "1uF" CAPC1608X87N 161.794,0.327 r270 top
C420 "1uF" CAPC1608X87N 155.671,0.365 r270 top
C421 "100nF" CAPC0603X33N#1 38.533,58.924 r0 bottom
C422 "100nF" CAPC0603X33N#1 84.336,43.275 r180 top
C423 "22uF" CAPC2012X135N 81.161,72.75 r270 bottom
C424 "22uF" CAPC2012X135N 80.936,51.725 r90 top
C425 "22uF" CAPC2012X135N 81.886,57.65 r270 bottom
C427 "100nF" CAPC1005X55N 96.035,69.263 r90 top
C428 "4.7uF" CAPC1005X55N 153.496,59.642 r90 bottom
C429 "4.7uF" CAPC1005X55N 151.261,60.783 r0 bottom
C430 "470nF" CAPC0603X33N#2 156.061,60.45 r180 bottom
C431 "470nF" CAPC0603X33N#2 154.617,56.26 r180 bottom
C432 "470nF" CAPC0603X33N#2 150.561,27.975 r180 bottom
C433 "470nF" CAPC0603X33N#2 154.95,59.138 r0 bottom
C434 "100nF" CAPC0603X33N#1 177.436,28.625 r180 bottom
C435 "100nF" CAPC0603X33N#1 177.436,55.083 r180 bottom
C436 "100nF" CAPC0603X33N#1 177.436,57.565 r180 bottom
C437 "100nF" CAPC0603X33N#1 177.436,25.975 r180 bottom
C438 "100nF" CAPC0603X33N#1 177.436,27.875 r180 bottom
C439 "100nF" CAPC0603X33N#1 177.436,55.8 r180 bottom
C440 "100nF" CAPC0603X33N#1 177.436,58.275 r180 bottom
C441 "100nF" CAPC0603X33N#1 177.436,60.6 r0 top
C442 "100nF" CAPC0603X33N#1 177.436,63.782 r0 top
C443 "100nF" CAPC0603X33N#1 177.436,61.325 r0 top
C444 "100nF" CAPC0603X33N#1 177.436,64.525 r0 top
C445 "100nF" CAPC0603X33N#1 177.436,60.6 r180 bottom
C446 "100nF" CAPC0603X33N#1 177.436,63.782 r180 bottom
C447 "100nF" CAPC0603X33N#1 177.436,61.325 r180 bottom
C448 "100nF" CAPC0603X33N#1 177.436,64.525 r180 bottom
C449 "100nF" CAPC0603X33N#1 177.436,22.5 r180 bottom
C450 "100nF" CAPC0603X33N#1 177.436,21.775 r180 bottom
C451 "470nF" CAPC1005X55N 112.986,35.048 r90 bottom
C452 "100nF" CAPC1005X55N 90.761,33.325 r90 bottom
C453 "100nF" CAPC1005X55N 99.761,35 r90 bottom
C454 "4.7uF" CAPC1005X55N 90.736,35.625 r270 bottom
C455 "470nF" CAPC1005X55N 99.761,33.15 r90 bottom
C456 "470nF" CAPC1005X55N 99.761,42.4 r90 bottom
C457 "100nF" CAPC1005X55N 103.911,35.575 r270 bottom
C458 "100nF" CAPC1005X55N 113.036,42.475 r90 bottom
C459 "470nF" CAPC1005X55N 103.936,33.325 r90 bottom
C460 "470nF" CAPC1005X55N 90.685,45.465 r90 bottom
C461 "100nF" CAPC1005X55N 103.915,45.561 r90 bottom
C462 "10nF" CAPC1005X55N 90.685,41.823 r270 bottom
C463 "10nF" CAPC1005X55N 103.915,41.935 r270 bottom
C464 "10nF" CAPC1005X55N 113.036,40.625 r270 bottom
C465 "470nF" CAPC1005X55N 99.761,40.6 r270 bottom
C466 "470nF" CAPC1005X55N 91.793,38.836 r270 bottom
C467 "100nF" CAPC1005X55N 90.685,43.631 r90 bottom
C468 "10nF" CAPC1005X55N 112.986,33.201 r90 bottom
C469 "10nF" CAPC1005X55N 103.961,37.15 r0 bottom
C470 "10nF" CAPC1005X55N 103.915,43.732 r90 bottom
C471 "4.7uF" CAPC1005X55N 95.386,40 r180 bottom
C472 "4.7uF" CAPC1005X55N 86.464,31.441 r180 top
C473 "4.7uF" CAPC1005X55N 83.422,39.502 r180 bottom
C474 "100nF" CAPC1005X55N 83.477,31.431 r180 bottom
C475 "100nF" CAPC1005X55N 83.477,31.431 r180 top
C476 "100nF" CAPC1005X55N 86.501,40.212 r180 bottom
C477 "100nF" CAPC1005X55N 86.501,40.212 r180 top
C478 "100nF" CAPC1005X55N 86.465,31.441 r180 bottom
C479 "100nF" CAPC0603X33N#1 38.533,59.637 r0 bottom
C480 "4.7uF" CAPC1005X55N 131.804,37.361 r180 bottom
C481 "4.7uF" CAPC1005X55N 130.561,34.976 r270 bottom
C482 "470nF" CAPC0603X33N#2 128.567,40.953 r0 bottom
C483 "470nF" CAPC0603X33N#2 132.257,35.388 r270 bottom
C484 "470nF" CAPC0603X33N#2 123.861,34.525 r90 bottom
C485 "470nF" CAPC0603X33N#2 134.519,38.965 r180 bottom
D1 "UCLAMP3305P.TCT" SON50P160X65_HS-7N 147.211,76.5 r0 top
D2 "USBLC6-2P6" USBLC6-2P6 2.181,67.154 r0 top
D3 "UCLAMP3305P.TCT" SON50P160X65_HS-7N 183.386,8.05 r180 bottom
D4 "UCLAMP3305P.TCT" SON50P160X65_HS-7N 147.211,73.75 r0 top
D5 "UCLAMP3305P.TCT" SON50P160X65_HS-7N 183.386,11.209 r180 bottom
D6 "UCLAMP3305P.TCT" SON50P160X65_HS-7N 183.386,20.632 r180 bottom
D7 "UCLAMP3305P.TCT" SON50P160X65_HS-7N 183.386,14.341 r180 bottom
D8 "UCLAMP3305P.TCT" SON50P160X65_HS-7N 183.386,17.486 r180 bottom
D10 "BAV99W" SOT65P210X110-3N 15.956,46.8 r90 top
D15 "UCLAMP3305P.TCT" SON50P160X65_HS-7N 71.511,81.3 r180 top
D17 "BAT165" SOD2512X110N 151.086,11.5 r270 bottom
D18 "BAT165" SOD2512X110N 164.336,11.675 r90 top
F1 "1.1A-16V" FUSR_BOURNS_MF-MSMF_STYLE1(H85) 80.834,67.941 r90 bottom
F3 "2.5A-16V" FUSR_BOURNS_MF-MSMF_STYLE2 66.511,0.35 r180 top
F4 "1.1A-16V" FUSR_BOURNS_MF-MSMF_STYLE1(H85) 79.786,53.9 r0 bottom
FB1 "60R@100MHz" INDC4516X180N 117.411,57.25 r90 top
FB2 "60R@100MHz" INDC4516X180N 117.861,21.475 r90 top
FB3 "60R@100MHz" INDC4516X180N 109.986,26.475 r0 top
FB4 "60R@100MHz" INDC4516X180N 112.036,55.925 r0 top
FTG1 "Use only in PCB" FIDUCIAL_TOP_S100-200 5.875,90.825 r90 top
FTG2 "Use only in PCB" FIDUCIAL_TOP_S100-200 179.882,-0.469 r90 bottom
FTG3 "Use only in PCB" FIDUCIAL_TOP_S100-200 192.325,90.65 r90 top
FTG4 "Use only in PCB" FIDUCIAL_TOP_S100-200 5.9,90.8 r90 bottom
FTG5 "Use only in PCB" FIDUCIAL_TOP_S100-200 193.941,90.4 r90 bottom
FTG6 "Use only in PCB" FIDUCIAL_TOP_S100-200 191.161,7.6 r90 top
HS1 "Heat Sink No Pad" HSINK_ATS_ATS-50350B-C1-R0 141.561,44.5 r180 top
IC1 "SI53312-B-GM" QFN50P700X700X90-45N-S295 33.361,58.428 r90 bottom locked
IC2 "Si5324C-C-GM" QFN50P600X600X90-37N-S425 20.483,56.199 r90 bottom locked
IC3 "LT3045EDD#PBF" SON50P300X300X80-11N-R175X248 59.511,58.3 r0 top
IC4 "XC7A200T-3FFG1156C" BGA1156C100P34X34_3500X3500X310 141.561,44.45 r0 top locked
IC6 "MPM54304GMN-0002" MPS_MPM54304GMN 133.823,5.742 r180 top
IC8 "MT41K256M16TW-107:P" BGA96C80P9X16_800X1400X120 95.261,39.325 r0 top locked
IC9 "TPS51200DRCT" "TEXAS_DRC (S-PVSON-N10)" 77.78,38.275 r180 top
IC10 "LT3045EDD#PBF" SON50P300X300X80-11N-R175X248 35.261,47.3 r0 top
IC11 "LT3045EDD#PBF" SON50P300X300X80-11N-R175X248 23.411,40.787 r90 top
IC12 "SN74AVC2T245RSWR" QFN40P140X180X55-10N 74.986,59.75 r180 top
IC14 "MPM54304GMN-0002" MPS_MPM54304GMN 79.536,5.875 r180 top
IC15 "TCA9548ARGER" QFN50P400X400X100-25N-S220 65.361,41.929 r0 top
IC16 "S25FL128SAGMFIR01" SOIC127P1030X265-16N 157.561,83.075 r270 top
IC17 "SN74AVC2T245RSWR" QFN40P140X180X55-10N 13.371,74.587 r270 top
IC18 "FT4232H-56Q" QFN50P800X800X100-57N-S620 21.626,64.808 r270 top locked
IC19 "SN74AVC2T245RSWR" QFN40P140X180X55-10N 11.466,70.015 r270 top
IC20 "SN74AVC2T245RSWR" QFN40P140X180X55-10N 12.101,65.189 r270 top
IC21 "93LC56B-I/OT" SOT95P270X145-6N 34.261,67.45 r0 top
IC22 "PCA9306DCTR" SOP65P400X130-8N 46.761,64.95 r180 top
IC23 "MPM54304GMN-0002" MPS_MPM54304GMN 106.736,8.8 r180 top locked
IC24 "MCP23017-E/SS" SOP65P780X200-28N 64.311,6.85 r90 bottom
IC25 "MCP23017-E/SS" SOP65P780X200-28N 45.408,41.5 r180 bottom
IC26 "MIC5219-3.3YM5" SOT95P280X145-5N 14.361,80.15 r0 top
IC27 "SN74LVC245APW" FP-PW0020A-MFG 112.997,72.636 r0 top
IC28 "PCA9539APW" SOP65P640X110-24N 64.961,9.875 r270 bottom
IC29 "PCA9539APW" SOP65P640X110-24N 42.508,42.15 r0 bottom
IC30 "24AA025E48T-I/OT" SOT95P280X145-6N 141.236,86.625 r90 top
IC31 "24AA025E48-I/SN" SOIC127P600X175-8N 141.261,86.55 r0 top
IC32 "MCP121T-240E/TT" SOT-23-TT3_L 123.586,85.4 r270 top
IC33 "SI53312-B-GM" QFN50P700X700X90-45N-S295 186.561,74.725 r270 top
IC34 "MCP23017-E/SS" SOP65P780X200-28N 101.247,70.511 r0 top
IC35 "SN74LVC245APW" FP-PW0020A-MFG 103.461,61.279 r0 top
IC36 "MT41K256M16TW-107:P" BGA96C80P9X16_800X1400X120 108.486,39.325 r0 top locked
IC37 "NCP114ASN330T" SOT95P280X100-5N 158.771,0.365 r180 top
IC38 "PCA9539APW" SOP65P640X110-24N 97.247,71.011 r180 top
J1 "MMCX-J-P-H-ST-TH1" SAMTEC_MMCX-J-P-H-ST-TH1 47.72,81.346 r270 top
J2 "MMCX-J-P-H-ST-TH1" SAMTEC_MMCX-J-P-H-ST-TH1 40.615,83.871 r90 top
J3 "Mini-Fit Jr.™" MOLEX_39-28-1043 169.686,4.625 r180 top
J4 "Header 2" SAMTEC_TSM-102-01-L-DV 169.783,18.29 r270 top
J5 "" SAMTEC_LSS-140-01-L-DV-A 86.861,64.45 r90 top locked
J6 "MCX" AMPHENOL_919-383J-51A -1.8,74.8 r180 top locked
J8 "Milli-Grid™" MOLEX_87832-1420 175.286,87.9 r180 top
J11 "P6" AMPHENOL_10052838-101LF 207.15,82.95 r90 top locked
J12 "P4" AMPHENOL_10052837-101LF 207.15,53.95 r90 top locked
J14 "P1" AMPHENOL_10052825-101LF 207.15,3.95 r90 top locked
J18 "MCX" AMPHENOL_919-383J-51A -1.8,54.4 r180 top
J19 "SFP" AMPHENOL_UE78B212700321 47.75,18.805 r0 top locked
J21 "KK®" MOLEX_22-27-2021 160.336,11.625 r270 top
J23 "Micro-USB AB 2.0" HIROSE_ZX62RD-AB-5P8 -2,64.6 r270 top
J24 "Header 10" SAMTEC_TSW-105-07-L-D-LL 28.168,88.278 r180 top
J29 "P3" AMPHENOL_10052837-101LF 207.15,34.95 r90 top locked
J31 "P5" AMPHENOL_10052824-101LF 207.15,67.95 r90 top locked
J33 "P2" AMPHENOL_10052837-101LF 207.15,18.95 r90 top locked
L1 "2.2uH" IND_WURTH_WE-PMCI_0806LR 32.236,37.788 r180 top
L2 "120R@100MHz" INDC1608X65N 18.832,49.976 r270 bottom
L3 "2.2uH" IND_WURTH_WE-PMCI_0806LR 54.011,57.3 r90 top
L4 "120R@100MHz" INDC1608X65N 133.561,45.45 r0 bottom
L5 "120R@100MHz" INDC1608X65N 141.611,44.35 r180 bottom
L7 "1uH" IND_BOURNS_SRN3015 123.267,4.134 r90 top
L9 "120R@100MHz" INDC1608X95N 180.804,79.799 r180 top
L19 "120R@100MHz" INDC1608X65N 59.511,12.3 r270 top
L20 "120R@100MHz" INDC1608X65N 33.661,27.25 r0 bottom
L21 "120R@100MHz" INDC1608X65N 35.511,25.3 r0 bottom
L22 "120R@100MHz" INDC1608X65N 9.912,78.69 r90 top
L23 "2.2uH" IND_WURTH_WE-PMCI_0806LR 25.161,36.287 r180 top
L24 "120R@100MHz" INDC1608X65N 23.404,75.222 r270 top
L25 "120R@100MHz" INDC1608X65N 18.324,73.952 r270 top
L29 "120R@100MHz" INDC1608X65N 39.311,52.9 r180 bottom
L30 "120R@100MHz" INDC1608X65N 59.511,26.3 r270 top
L31 "120R@100MHz" INDC1608X65N 59.511,29.3 r90 top
L32 "120R@100MHz" INDC1608X65N 34.261,12.3 r0 bottom
L33 "120R@100MHz" INDC1608X65N 34.261,10.55 r0 bottom
L34 "120R@100MHz" INDC1608X65N 59.511,15.3 r90 top
L35 "2.2uH" IND_WURTH_WE-PMCI_0806LR 30.802,45.35 r90 top
L36 "120R@100MHz" INDC1608X65N 60.011,60.8 r180 top
L37 "120R@100MHz" INDC1608X65N 70.261,58.8 r0 top
LD1 "Green" LED_KINGBRIGHT_KPH-1608CGCK 6.761,73.05 r90 top
LD2 "Green" LED_KINGBRIGHT_KPH-1608CGCK 29.661,-0.25 r90 top
LD3 "Green" LED_KINGBRIGHT_KPH-1608CGCK 27.805,-0.25 r90 top
LD5 "Green" LED_KINGBRIGHT_KPH-1608CGCK 22.239,-0.25 r90 top
LD6 "Green" LED_KINGBRIGHT_KPH-1608CGCK 14.817,-0.25 r90 top
LD7 "Green" LED_KINGBRIGHT_KPH-1608CGCK 18.528,-0.25 r90 top
LD8 "Green" LED_KINGBRIGHT_KPH-1608CGCK 16.672,-0.25 r90 top
LD9 "Green" LED_KINGBRIGHT_KPH-1608CGCK 25.95,-0.25 r90 top
LD10 "Green" LED_KINGBRIGHT_KPH-1608CGCK 24.094,-0.25 r90 top
LD11 "Green" LED_AVAGO_HSME-C120 -5.1,28.25 r270 bottom
LD12 "Green" LED_KINGBRIGHT_KPH-1608CGCK 20.383,-0.25 r90 top
LD13 "Green" LED_AVAGO_HSME-C120 -5.1,43.4 r270 bottom
LD14 "Red" LED_AVAGO_HSMC-C120 -5.1,49 r270 bottom
LD15 "Green" LED_AVAGO_HSME-C120 -5.1,23.8 r270 bottom
LD16 "Green" LED_AVAGO_HSME-C120 -5.1,13.8 r270 bottom
LD17 "Green" LED_AVAGO_HSME-C120 -5.1,9.3 r270 bottom
LD18 "Green" LED_AVAGO_HSME-C120 -5.1,37.8 r270 bottom
M1 "Plated Hole" c600h270#1 166.961,1.15 r90 top
M2 "Plated Hole" c600h270#2 162.211,100.15 r90 top
M3 "PTH_3.4X6_BTKO" PTH-M3.4x6.0_BTKO 187.6,88.9 r180 top
M4 "PTH_3.4X6_BTKO" PTH-M3.4x6.0_BTKO 187.6,0 r0 top
M5 "PTH_3.4X6_BTKO" PTH-M3.4x6.0_BTKO 97.6,88.9 r180 top
M6 "PTH_3.4X6_BTKO" PTH-M3.4x6.0_BTKO 97.6,0 r0 top
OSC1 "0.2-800MHz" OSC_SILICON-LAB_SI549-A 64.511,68.05 r180 top
OSC2 "125MHz" OSC_SILICON-LAB_SI510-6N 130.933,86.75 r270 top
OSC3 "0.2-800MHz" OSC_SILICON-LAB_SI549-A 73.261,68.05 r180 top
Plate1 "Cover SFP" AMPHENOL_U77A11108000P -51.639,50.55 r0 top
Plate2 "Cover SFP" AMPHENOL_U77A11108000P -52.389,1.05 r0 top
Plate3 "Cover SFP" AMPHENOL_U77A11108000P -51.889,34.05 r0 top
Plate4 "Cover SFP" AMPHENOL_U77A11108000P -52.139,17.3 r0 top
Q1 "114.285MHZ" XTAL_CONNOR_CS 14.895,54.14 r270 top
Q2 "12MHZ" XTAL_TXC_7M 26.198,72.174 r270 top value=12MHz
R1 "10k" RESC1005X40N 122.29,50.763 r270 bottom
R2 "10k" RESC1005X40N 123.331,50.763 r270 bottom
R3 "100" RESC1005X40N 14.77,57.455 r270 bottom
R4 "10k" RESC1005X40N 28.261,58.675 r180 bottom
R5 "10k" RESC1005X40N 113.711,14.7 r90 top
R6 "100" RESC1005X40N 28.736,57.195 r90 bottom
R7 "49R9" RESC1005X40N 32.411,63.55 r90 bottom
R8 "49R9" RESC1005X40N 31.186,63.55 r90 bottom
R9 "68" RESC1005X40N 126.361,49.15 r0 bottom
R10 "24k" RESC1005X40N 63.011,57.8 r180 top
R11 "240" RESC1005X40N -1.239,41.55 r0 bottom
R12 "100" RESC1005X40N 29.502,59.708 r90 top
R13 "0" RESC1005X40N 14.082,45.053 r90 top
R14 "20k" RESC1005X40N 121.211,-0.375 r0 top
R15 "1k" RESC1005X40N 5.355,73.216 r270 top
R16 "10k" RESC1005X40N 146.303,13.305 r90 top
R17 "4k7" RESC1005X40N 20.011,60.525 r180 bottom
R18 "10k" RESC1005X40N 119.386,-0.375 r0 top
R19 "2k2" RESC1005X40N 1.976,44.632 r90 bottom
R20 "240" RESC1005X40N -3.368,48.002 r0 bottom
R21 "0" RESC1005X40N 139.191,6.404 r180 top
R22 "200" RESC1005X40N 20.102,49.976 r90 bottom
R23 "2k2" RESC1005X40N 3.024,48.95 r90 bottom
R24 "15k" RESC1005X40N 146.753,11.905 r180 top
R25 "33k" RESC1005X40N 24.15,44.165 r270 top
R26 "15k" RESC1005X40N 113.711,12.85 r90 top
R27 "0" RESC1005X40N 139.191,7.336 r180 top
R28 "1k" RESC1005X40N 65.011,57.8 r180 top
R29 "0" RESC1005X40N 45.861,76.925 r0 bottom
R30 "0" RESC1005X40N 39.186,79.575 r0 bottom
R31 "10k" RESC1005X40N 149.111,6.755 r90 bottom
R32 "15k" RESC1005X40N 149.111,4.905 r90 bottom
R33 "10k" RESC1005X40N 54.511,49.05 r270 top
R34 "2k2" RESC1005X40N 68.011,73.3 r90 top
R35 "2k2" RESC1005X40N 66.961,73.3 r90 top
R36 "0" RESC1005X40N 67.536,63.025 r90 top
R37 "7k5" RESC1005X40N 119.847,2.905 r270 top
R38 "0" RESC1005X40N 66.536,63.025 r270 top
R39 "15k" RESC1005X40N 119.847,1.03 r270 top
R40 "10k" RESC1005X40N 118.915,1.042 r270 top
R41 "2k2" RESC1005X40N 69.961,73.3 r90 top
R42 "1k" RESC1005X40N 149.194,82.995 r90 top
R43 "1k" RESC1005X40N 150.194,82.995 r270 top
R44 "1k" RESC1005X40N 29.661,2.197 r90 top
R45 "2k2" RESC1005X40N 28.474,39.023 r180 bottom
R46 "10k" RESC1005X40N 51.261,52.55 r0 top
R47 "7k5" RESC1005X40N 87.586,10.205 r90 top
R48 "0" RESC1005X40N 85.961,7.1 r180 top
R49 "24k" RESC1005X40N 87.586,12.08 r90 top
R50 "2k2" RESC1005X40N 71.011,73.3 r90 top
R51 "0" RESC1005X40N 86.011,7.975 r180 top
R52 "1k" RESC1005X40N 131.761,57.625 r270 bottom
R53 "0" RESC1005X40N 124.091,82.925 r180 top
R54 "0" RESC1005X40N 56.261,58.05 r0 top
R55 "1k" RESC1005X40N 27.805,2.197 r90 top
R56 "0" RESC1005X40N 24.162,38.038 r180 top
R57 "300" RESC1005X40N 18.393,45.185 r180 bottom
R58 "10k" RESC1005X40N 60.861,79.025 r0 top
R59 "15k" RESC1005X40N 99.862,4.351 r90 top
R60 "10k" RESC1005X40N 100.825,3.4 r90 top
R61 "1k" RESC1005X40N 124.086,81.35 r180 top
R62 "68k" RESC1005X40N 70.638,3.48 r270 top
R63 "10k" RESC1005X40N 74.336,7.525 r90 top
R64 "15k" RESC1005X40N 70.638,5.305 r270 top
R65 "0" RESC1005X40N 111.991,9.483 r180 top
R66 "10k" RESC1005X40N 81.161,56.2 r180 top
R67 "0" RESC1005X40N 111.991,10.411 r180 top
R68 "1M1" RESC2012X60N 6.025,1.125 r0 top
R69 "4M7" RESC2113X55N 43.661,0.15 r0 bottom
R70 "4M7" RESC2113X55N 47.111,0.15 r0 bottom
R71 "4M7" RESC2113X55N 35.724,0.15 r180 bottom
R72 "4M7" RESC2113X55N 32.261,0.15 r180 bottom
R73 "4k7" RESC1005X40N 176.456,11.731 r180 top
R74 "10k" RESC1005X40N 20.383,2.197 r90 top
R75 "10k" RESC1005X40N 176.456,6.338 r180 top
R76 "10k" RESC1005X40N 176.456,7.686 r180 top
R77 "10k" RESC1005X40N 176.456,13.079 r180 top
R78 "10k" RESC1005X40N 176.456,3.641 r180 top
R79 "10k" RESC1005X40N 176.456,10.383 r180 top
R80 "0" RESC1005X40N 10.786,49.197 r0 top
R81 "10k" RESC1005X40N 176.456,9.034 r180 top
R82 "0" RESC1005X40N 64.486,15.66 r90 bottom
R83 "4k7" RESC1005X40N 176.456,15.776 r180 top
R84 "4k7" RESC1005X40N 176.456,14.428 r180 top
R85 "10k" RESC1005X40N 176.456,18.473 r180 top
R86 "10k" RESC1005X40N 25.95,2.197 r90 top
R87 "1k" RESC1005X40N 24.094,2.197 r90 top
R88 "10k" RESC1005X40N 22.239,2.197 r90 top
R89 "10k" RESC1005X40N 14.817,2.197 r90 top
R90 "10k" RESC1005X40N 18.528,2.197 r90 top
R91 "10k" RESC1005X40N 16.672,2.197 r90 top
R92 "10k" RESC1005X40N 176.456,17.124 r180 top
R93 "210k" RESC1005X40N 154.761,2.589 r270 bottom
R94 "2k2" RESC1005X40N 161.961,90.275 r90 bottom
R95 "2k2" RESC1005X40N 154.411,90.275 r90 bottom
R96 "2k2" RESC1005X40N 153.061,78.65 r90 bottom
R97 "0" RESC1005X40N 76.761,62.8 r90 top
R98 "0" RESC1005X40N 75.761,62.8 r270 top
R99 "240" RESC1005X40N 96.536,36.6 r90 bottom
R100 "240" RESC1005X40N 109.861,36.775 r90 bottom
R101 "39" RESC1005X40N 83.441,36.806 r180 top
R102 "39" RESC1005X40N 86.481,34.901 r180 bottom
R103 "39" RESC1005X40N 83.441,33.625 r180 bottom
R104 "39" RESC1005X40N 86.481,36.128 r180 bottom
R105 "39" RESC1005X40N 86.481,35.58 r180 top
R106 "39" RESC1005X40N 83.416,35.032 r180 bottom
R107 "39" RESC1005X40N 86.474,33.675 r180 bottom
R108 "39" RESC1005X40N 86.481,34.353 r180 top
R109 "39" RESC1005X40N 86.461,32.38 r180 bottom
R110 "39" RESC1005X40N 83.441,34.353 r180 top
R111 "39" RESC1005X40N 83.441,38.605 r180 bottom
R112 "39" RESC1005X40N 86.461,33.126 r180 top
R113 "39" RESC1005X40N 86.481,36.806 r180 top
R114 "39" RESC1005X40N 83.461,33.126 r180 top
R115 "39" RESC1005X40N 83.441,32.38 r180 bottom
R116 "39" RESC1005X40N 83.441,36.115 r180 bottom
R117 "39" RESC1005X40N 86.461,39.26 r180 top
R118 "39" RESC1005X40N 83.441,39.26 r180 top
R119 "39" RESC1005X40N 83.441,37.36 r180 bottom
R120 "39" RESC1005X40N 83.422,35.638 r180 top
R121 "39" RESC1005X40N 83.441,38.033 r180 top
R122 "39" RESC1005X40N 86.481,37.355 r180 bottom
R123 "39" RESC1005X40N 86.481,38.033 r180 top
R124 "39" RESC1005X40N 86.481,38.582 r180 bottom
R125 "4k7" RESC1005X40N 92.536,31.7 r270 bottom
R126 "39" RESC1005X40N 95.386,39.025 r180 bottom
R127 "10k" RESC1005X40N 74.055,38 r180 top
R128 "10k" RESC1005X40N 76.58,36.05 r90 bottom
R129 "10k" RESC1005X40N 77.505,36.05 r90 bottom
R130 "10k" RESC1005X40N 47.947,34.595 r270 bottom
R131 "0" RESC1005X40N 60.263,13.029 r90 bottom
R132 "0" RESC1005X40N 39.116,37.08 r90 bottom
R133 "10k" RESC1005X40N 50.947,34.595 r90 bottom
R134 "10k" RESC1005X40N 61.606,22.904 r0 bottom
R135 "10k" RESC1005X40N 61.606,27.656 r0 bottom
R136 "10k" RESC1005X40N 56.616,27.25 r0 bottom
R137 "10k" RESC1005X40N 38.231,30.02 r180 bottom
R138 "10k" RESC1005X40N 45.947,34.595 r90 bottom
R139 "10k" RESC1005X40N 13.697,48.145 r270 bottom
R140 "10k" RESC1005X40N 61.606,26.468 r180 bottom
R141 "10k" RESC1005X40N 61.606,25.28 r180 bottom
R142 "240" RESC1005X40N -1.489,24.8 r180 bottom
R143 "240" RESC1005X40N -1.489,29.8 r180 bottom
R144 "10k" RESC1005X40N 44.913,3.055 r270 bottom
R145 "10k" RESC1005X40N 61.606,20.528 r0 bottom
R146 "0" RESC1005X40N 143.155,77.092 r0 top
R147 "1k" RESC1005X40N 107.383,77.593 r0 top
R148 "2k2" RESC1005X40N 64.001,46.341 r0 top
R149 "2k2" RESC1005X40N 67.242,45.084 r0 top
R150 "10k" RESC1005X40N 152.836,12.325 r90 bottom
R151 "10k" RESC1005X40N 56.607,46.447 r90 top
R152 "10k" RESC1005X40N 111.512,3.909 r90 top
R153 "10k" RESC1005X40N 110.535,2.996 r90 top
R154 "10k" RESC1005X40N 12.697,48.145 r90 bottom
R155 "10k" RESC1005X40N 183.311,70.075 r0 top
R156 "11k" RESC1005X40N 89.961,3.25 r180 top
R157 "1k5" RESC1005X40N 89.986,4.2 r0 top
R158 "10k" RESC1005X40N 90.53,8.305 r90 top
R159 "10k" RESC1005X40N 89.536,8.305 r90 top
R160 "100" RESC0603X28N 146.561,33.95 r0 bottom